# Altium PCB 数控电源.PcbDoc (part 4 of 4)
Units mm, origin at the board's own origin, x right, y up, seen from the top; angles counter-clockwise.
Board outline 99.32 x 99.37 mm, 4 copper layers (Top Layer 1, GND, POWER, Bottom Layer), stack 0.603 mm thick; 325 components, 180 nets, 929 pads, 616 vias.
Unrouted connection lines stored in the file: 13.
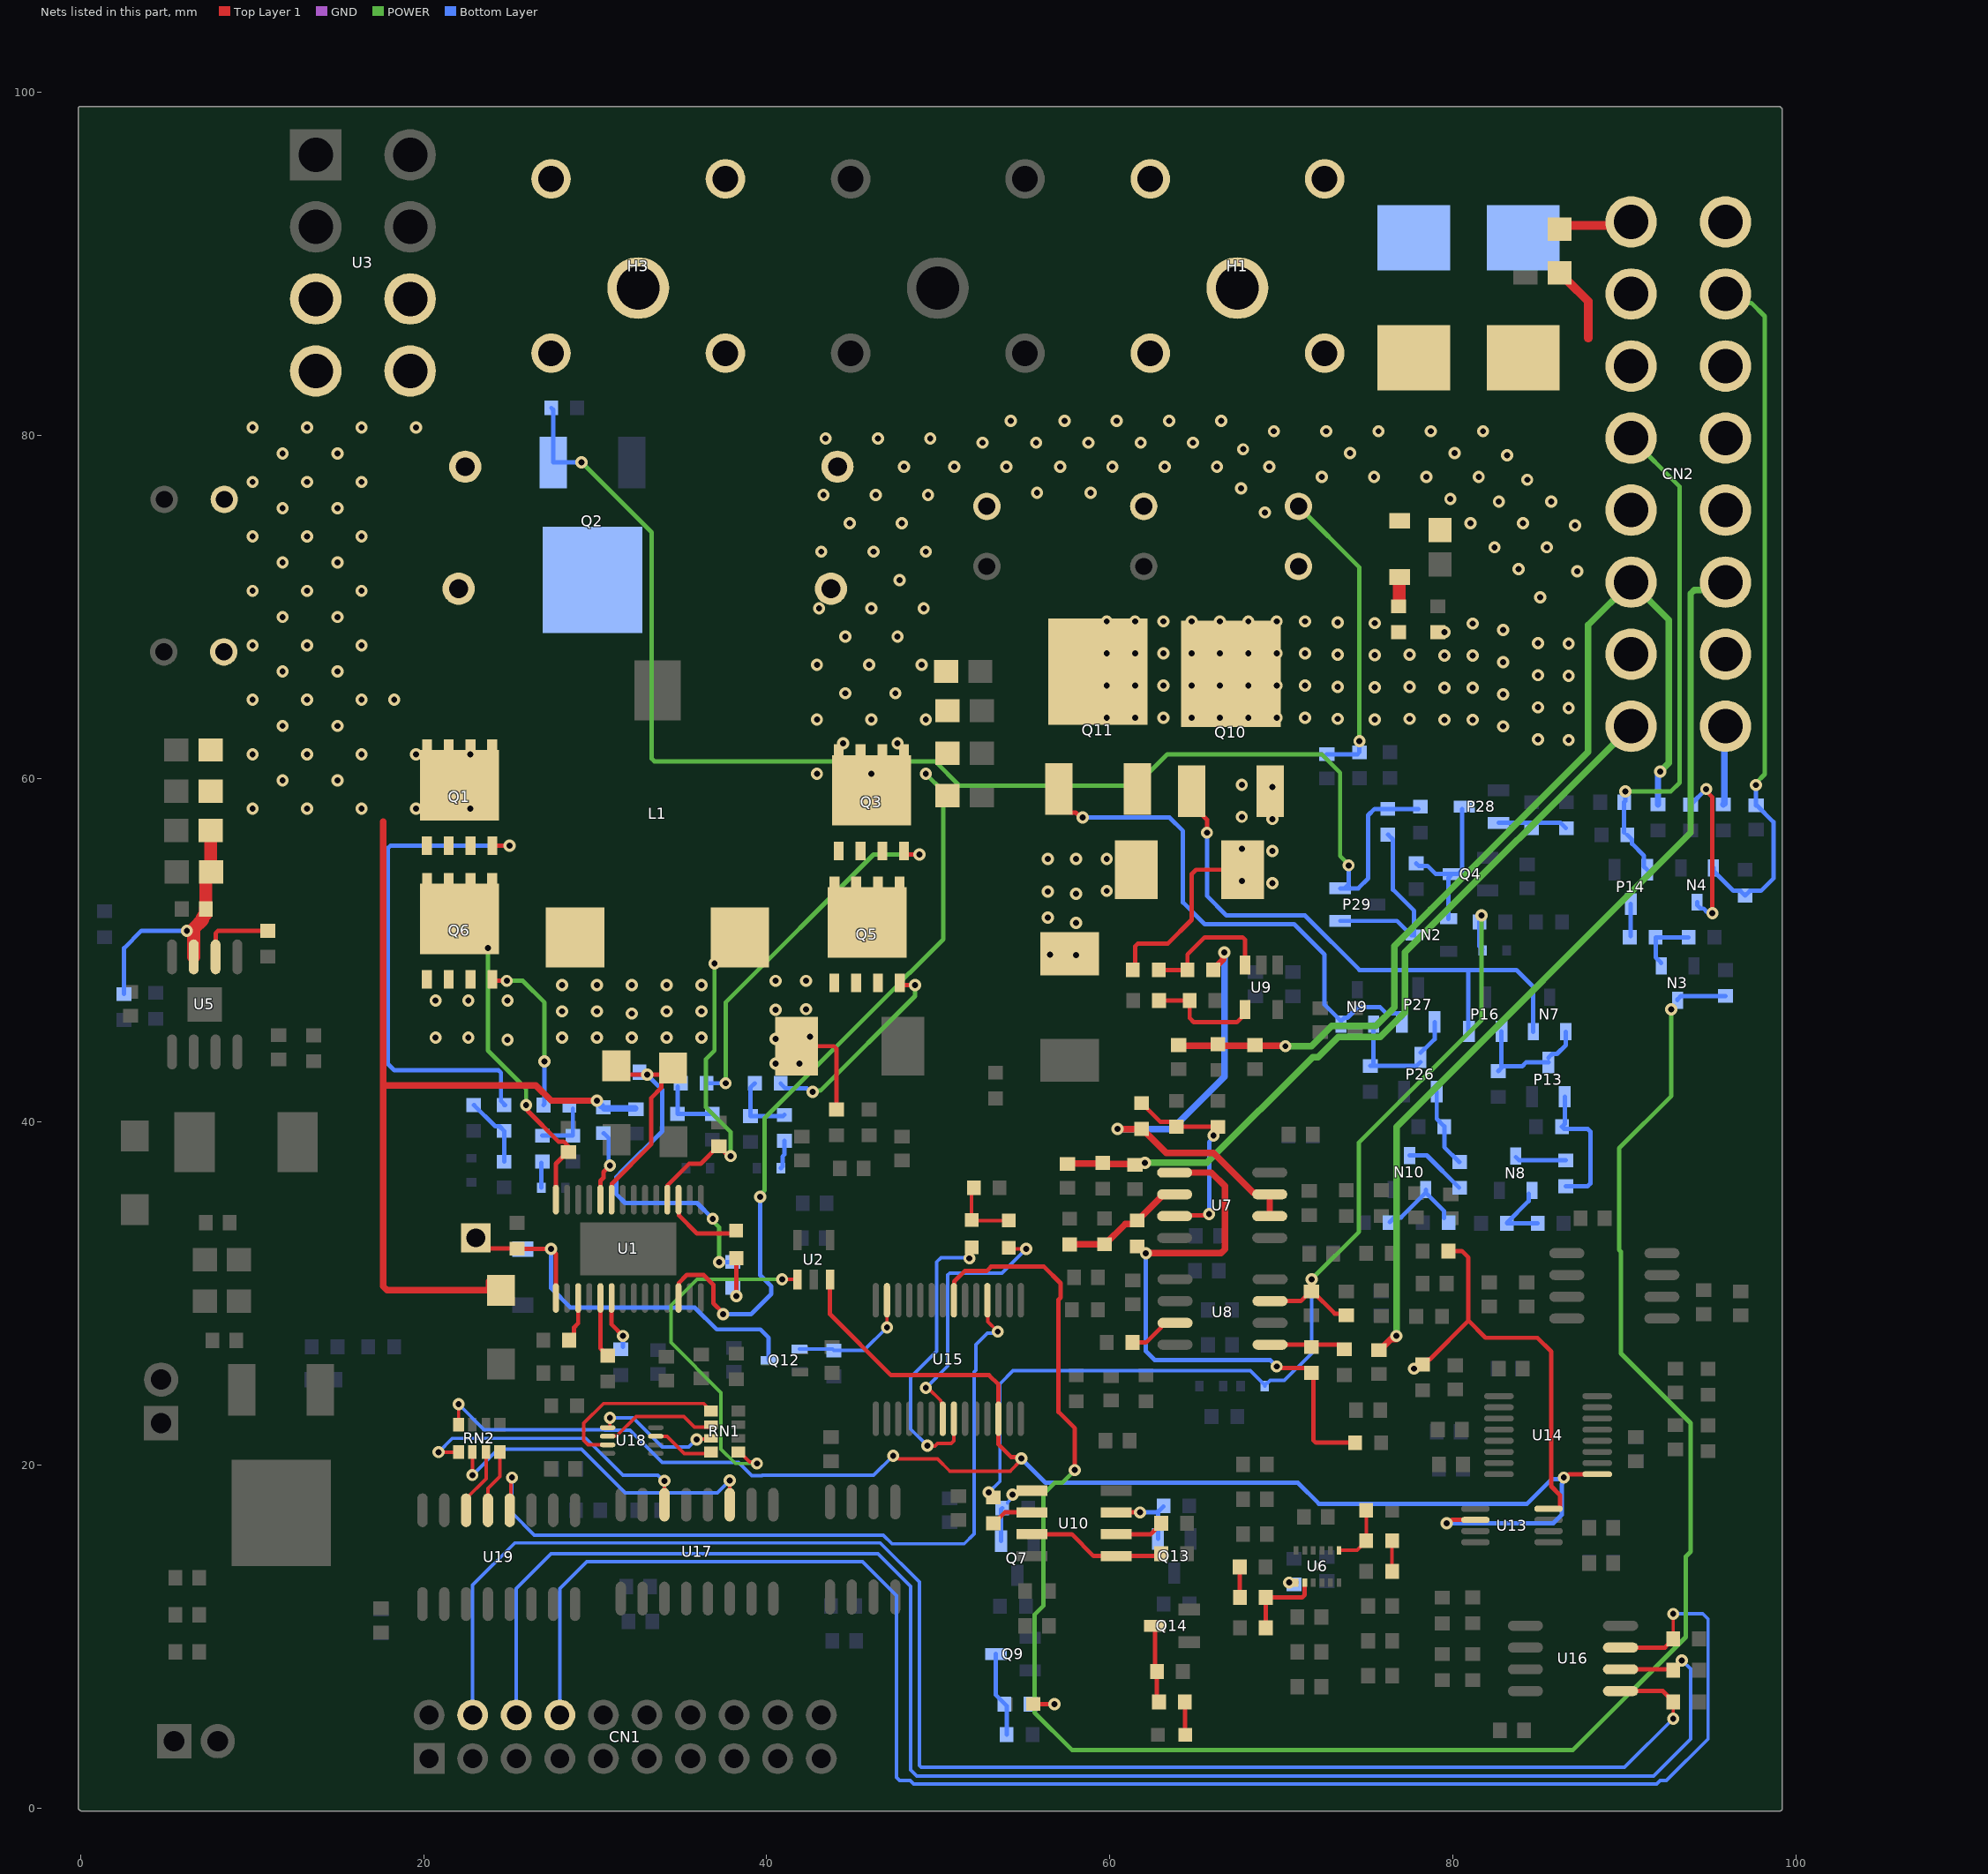
[diagram p5: the nets of this part, all layers, seen from the top]

## Via types
v1: diameter 0.711, hole 0.356, Top Layer 1 to Bottom Layer, 600 vias
v2: diameter 0.5, hole 0.3, Top Layer 1 to Bottom Layer, 12 vias
v3: diameter 0.61, hole 0.305, Top Layer 1 to Bottom Layer, 4 vias

## Nets (pads, with @x,y where several pads share a name; then routed paths per layer and width w, separated by ;. In a path a pad name is that pad's centre, name@x,y a point inside that pad or via, vN(x,y) a via of type N, cw(c..) or ccw(c..) an arc to the next point about the centre after c; other vN are vias at no path point) (continued)
NetD8_1: D8.1 R24.2 | length 1.7
  Bottom Layer w0.254: D8.1@40.826,37.296 40.923,37.392 40.923,37.976 41.026,38.08 R24.2@41.026,38.891
NetD9_1: D9.1 R22.2 | length 1.5
  Bottom Layer w0.254: D9.1@26.859,36.151 R22.2@26.859,37.618
NetD10_1: D10.1 R96.1 | length 2.6
  Top Layer 1 w0.254: D10.1@55.537,6.055 55.541,6.052 v1(56.77,6.052)
  Bottom Layer w0.254: R96.1@55.364,6.052 v1(56.77,6.052)
NetD12_1: D12.1 R57.1 | length 1.9
  Top Layer 1 w0.254: D12.1@64.372,4.291 R57.1@64.372,6.179
NetD14_1: D14.1 U1.17 | length 4.8
  Top Layer 1 w0.254: U1.17@34.86,35.462 34.86,35.176 34.819,35.135 34.877,35.077 34.877,34.549 35.942,33.484 38.06,33.484 D14.1@38.224,33.649
NetD14_2: D14.2 R8.1 | length 2.2
  Top Layer 1 w0.254: v1(38.231,29.837) D14.2@38.231,32.05
NetD15_1: D15.1 D16.1 R34.1 | length 4.1
  Top Layer 1 w0.203: R34.1@52.071,36.151 51.94,36.021 D16.1@51.94,34.284 51.978,34.246 D15.1@54.103,34.246
NetF1_2: F1.2 H1.1 H1.2 H1.3 H1.4 H1.5
NetF2_2: F2.2 H3.1 H3.2 H3.3 H3.4 H3.5
NetN2_1: N2.1 P28.3 Q4.3 R85.2 | length 9.3
  Bottom Layer w0.254: R85.2@77.852,55.065 77.999,54.918 78.516,54.918 78.995,54.439 Q4.3@79.962,54.439 ; N2.1@79.739,51.833 79.739,54.216 Q4.3@79.962,54.439 ; P28.3@80.525,58.239 80.525,54.662 80.302,54.439 Q4.3@80.027,54.439 Q4.3@79.962,54.439
NetN2_3: N2.3 P29.1 R11.1 | length 11.2
  Bottom Layer w0.254: P29.1@73.423,51.711 76.737,51.711 77.565,50.883 N2.3@77.74,50.883 77.74,52.296 76.506,53.531 76.506,56.457 76.23,56.734 R11.1@76.201,56.734
NetN3_1: N3.1 R99.1 R101.2 | length 3.6
  Bottom Layer w0.254: N3.1@92.142,49.263 91.813,49.591 R99.1@91.813,50.756 R101.2@93.735,50.756
NetN4_3: N4.3 R97.2 | length 9.8
  Top Layer 1 w0.254: v1(94.765,59.397) 94.765,59.273 95.124,58.914 v1(95.124,52.153)
  Bottom Layer w0.254: R97.2@93.854,58.486 v1(94.765,59.397) ; N4.3@94.235,52.803 94.235,52.628 94.433,52.43 94.608,52.43 94.798,52.241 v1@95.036,52.241
NetN7_1: N7.1 P13.3 P16.1 R95.1 | length 7.4
  Bottom Layer w0.254: R95.1@82.643,42.957 R95.1@82.831,43.145 ; P16.1@82.831,45.268 R95.1@82.831,43.145 ; P13.3@85.564,43.458 84.257,43.458 84.032,43.233 82.919,43.233 R95.1@82.831,43.145 ; P13.3@85.564,43.733 85.787,43.956 86.062,43.956 86.58,44.474 N7.1@86.58,45.252
NetN7_2: N7.2 P16.2 Q10.1 | length 33.9
  Top Layer 1 w0.254: Q10.1@64.766,59.27 65.439,58.597 65.439,57.835 65.66,57.614 v1(65.66,56.852)
  Bottom Layer w0.254: v1(65.66,56.852) 65.66,53.169 66.803,52.026 71.375,52.026 74.55,48.851 80.9,48.851 ; P16.2@80.931,45.268 80.9,45.299 80.9,48.851 ; N7.2@84.68,45.252 84.68,47.865 83.694,48.851 80.9,48.851
NetN8_1: N8.1 R74.2 R104.1 | length 4
  Bottom Layer w0.254: N8.1@84.411,35.8 84.411,35.373 83.142,34.105 R104.1@83.142,34.076 R74.2@84.938,34.076
NetN8_3: N8.3 R92.2 | length 3
  Bottom Layer w0.254: N8.3@83.659,37.948 83.857,37.75 R92.2@86.58,37.75
NetN9_1: N9.1 P26.3 P27.1 R122.1 | length 7.4
  Bottom Layer w0.254: R122.1@75.185,43.254 77.88,43.254 P26.3@78.106,43.48 ; R122.1@75.373,43.442 N9.1@75.373,45.694 ; P26.3@78.106,44.03 78.329,44.253 78.369,44.253 78.929,44.813 P27.1@78.929,45.819
NetN9_2: N9.2 P27.2 Q11.1 | length 30.8
  Top Layer 1 w0.254: Q11.1@57.019,59.397 57.019,58.697 57.692,58.024 58.014,58.024 v1@58.297,57.741
  Bottom Layer w0.254: v1(58.421,57.741) 63.479,57.741 64.263,56.957 64.263,52.788 65.533,51.518 70.74,51.518 72.518,49.74 72.518,46.824 N9.2@73.473,45.869 ; N9.2@73.473,45.694 N9.2@73.473,45.869 ; P27.2@77.029,46.094 76.806,46.317 76.114,46.317 75.739,46.692 74.471,46.692 73.846,46.067 73.671,46.067 N9.2@73.473,45.869
NetN10_1: N10.1 R89.2 R123.1 | length 4.9
  Bottom Layer w0.254: R123.1@76.319,34.148 76.595,34.424 76.978,34.424 N10.1@78.421,35.867 ; N10.1@78.421,36.042 N10.1@78.421,35.867 ; R89.2@79.472,34.395 79.472,34.815 N10.1@78.421,35.867
NetN10_3: N10.3 R111.2 | length 3.7
  Bottom Layer w0.254: N10.3@77.471,38.041 78.473,38.041 R111.2@80.363,36.151
NetP13_1: P13.1 R82.2 R92.1 | length 8.1
  Bottom Layer w0.254: P13.1@86.514,41.458 86.514,39.869 R82.2@86.352,39.707 86.479,39.58 87.863,39.58 88.012,39.431 88.012,36.405 87.85,36.243 R92.1@86.58,36.243
NetP14_3: P14.3 R99.2 | length 1.9
  Bottom Layer w0.254: R99.2@90.364,50.813 P14.3@90.364,52.693
NetP26_1: P26.1 R109.2 R111.1 | length 4.6
  Bottom Layer w0.254: P26.1@79.056,41.755 79.056,40.174 R109.2@79.494,39.736 ; R109.2@79.494,39.707 79.494,38.527 80.363,37.658 R111.1@80.392,37.658
NetP28_2: P28.2 R13.1 R33.2 | length 4.1
  Bottom Layer w0.254: P28.2@82.662,57.426 86.275,57.426 R13.1@86.586,57.115
NetP29_2: P29.2 Q2.1 R10.1 R11.2 R75.2 | length 81.8
  POWER w0.254: v1(29.211,78.442) 33.3,74.353 33.3,61.166 33.449,61.018 49.81,61.018 51.237,59.591 61.522,59.591 63.356,61.424 72.35,61.424 73.423,60.352 73.423,55.497 73.915,55.005 v1(73.915,54.947)
  Bottom Layer w0.254: R75.2@27.441,81.617 27.555,81.504 Q2.1@27.555,78.437 27.56,78.442 v1(29.211,78.442) ; v1(73.915,54.947) 73.915,53.834 73.692,53.611 P29.2@73.423,53.611 74.484,53.611 75.058,54.185 75.058,57.868 75.43,58.24 R11.2@76.201,58.24 R10.1@77.979,58.24
NetQ1_4: Q1.4 R16.1 | length 29.6
  Top Layer 1 w0.254: Q1.4@24.004,56.09 v1(25.02,56.09)
  Bottom Layer w0.254: R16.1@24.695,40.97 24.759,40.97 24.512,41.217 24.512,42.86 24.363,43.009 18.289,43.009 17.908,43.39 17.908,55.941 18.057,56.09 v1(25.02,56.09)
NetQ2_2: Q2.2 U12.1 U21.1
NetQ3_4: Q3.4 R17.2 | length 21.7
  Top Layer 1 w0.254: Q3.4@48.007,55.795 48.007,55.745 48.169,55.582 v1(48.896,55.582)
  POWER w0.254: v1(37.602,42.249) 37.602,46.956 46.23,55.583 v1(48.896,55.582) v1(48.896,55.582)
  Bottom Layer w0.254: R17.2@36.497,42.249 v1(37.602,42.249)
NetQ5_1: Q5.1 Q5.2 Q5.3 Q6.1 Q6.2 Q6.3 R28.1 R29.2 | length 5.9
  Top Layer 1 w0.254: R29.2@41.73,44.406 43.921,44.406 44.07,44.257 R28.1@44.07,40.714
  other v1: 40.514,43.39 41.911,43.39 24.893,44.787 40.514,44.829 20.702,44.914 22.607,44.914 28.068,44.914 30.1,44.914 32.132,44.914 34.164,44.914 36.196,44.914 42.52,44.951 32.132,46.311 28.068,46.438 30.1,46.438 34.164,46.438 36.196,46.438 40.514,46.523 42.292,46.565 20.702,47.073 22.607,47.073 24.893,47.073 28.068,47.962 30.1,47.962 32.132,47.962 34.164,47.962 36.196,47.962 40.514,48.216 42.292,48.216
NetQ5_4: Q5.4 R23.2 | length 11.9
  Top Layer 1 w0.254: Q5.4@47.753,48.089 47.88,47.962 v1(48.642,47.962)
  POWER w0.254: v1(42.673,41.739) 42.749,41.815 43.13,41.815 48.642,47.327 v1(48.642,47.962)
  Bottom Layer w0.254: R23.2@40.815,42.249 40.815,42.22 41.091,41.944 42.345,41.944 42.549,41.739 v1(42.673,41.739)
NetQ6_4: Q6.4 R9.1 | length 9.7
  Top Layer 1 w0.254: Q6.4@24.004,48.302 24.09,48.216 v1(24.849,48.216)
  GND w0.254: v1@24.761,48.127 v1(24.849,48.216)
  POWER w0.254: v1(24.849,48.216) 25.782,48.216 27.052,46.946 v1(27.052,43.517)
  Bottom Layer w0.254: R9.1@26.989,40.979 27.052,41.041 v1(27.052,43.517)
NetQ7_1: Q7.1 R121.1 U10.1 | length 2.6
  Bottom Layer w0.203: R121.1@54.032,17.784 54.032,17.812 54.235,18.016 54.235,18.164 v1(54.333,18.261)
  Bottom Layer w0.254: Q7.1@53.661,15.561 53.661,17.412 R121.1@53.73,17.482
NetQ9_3: Q9.3 R14.1 R96.2 | length 5
  Bottom Layer w0.254: Q9.3@53.357,8.973 53.357,6.581 53.984,5.954 R14.1@53.984,4.274
NetQ10_3: Q10.3 R77.2 R79.2 | length 11.1
  Top Layer 1 w0.254: R77.2@61.342,48.851 61.469,48.978 61.469,50.226 61.618,50.375 63.374,50.375 64.771,51.772 64.771,54.439 65.025,54.693 R79.2@67.745,54.693
  other v1: 69.47,53.908 67.692,54.035 69.47,55.778 67.692,55.905 69.47,57.649 67.692,57.776 69.47,59.519 67.692,59.646
NetQ11_3: Q11.3 R79.1 R84.2
  other v1: 58.04,49.717 56.516,49.74 58.04,51.587 56.389,51.899 58.04,53.296 56.389,53.423 59.818,53.458 56.389,55.328 58.04,55.328 59.818,55.328
NetQ13_1: Q13.1 R124.1 U10.7 | length 4.6
  Top Layer 1 w0.254: U10.7@60.364,17.228 v1(61.765,17.228)
  Bottom Layer w0.254: v1@61.853,17.141 v1(61.765,17.228) 62.747,17.228 62.823,17.304 62.852,17.304 R124.1@63.128,17.58 ; Q13.1@62.805,15.688 R124.1@62.805,17.257
NetQ14_3: Q14.3 R27.1 R57.2 | length 4.2
  Top Layer 1 w0.254: R27.1@62.628,8.077 Q14.3@62.628,10.624 ; R57.2@62.747,6.297 R27.1@62.747,7.957
NetR2_1: R2.1 U1.6 | length 3.1
  Top Layer 1 w0.254: U1.6@30.958,29.731 30.958,28.181 v1(31.624,27.515)
  Bottom Layer w0.254: R2.1@31.624,26.871 v1(31.624,27.515)
NetR3_1: R3.1 U1.5 | length 3.6
  Top Layer 1 w0.254: U1.5@30.308,29.731 30.308,26.79 30.43,26.668 30.43,26.64 30.706,26.363 R3.1@30.735,26.363
NetR5_2: R5.2 U1.3 | length 2.7
  Top Layer 1 w0.254: R5.2@28.487,27.263 28.764,27.539 28.764,28.004 29.01,28.25 U1.3@29.01,29.731
NetR6_1: R6.1 U1.24 | length 4.3
  Top Layer 1 w0.254: U1.24@30.308,35.462 30.308,36.559 30.483,36.734 30.483,37.067 v1(30.862,37.445)
  Bottom Layer w0.254: R6.1@30.481,39.335 30.51,39.335 30.786,39.058 30.786,37.521 v1(30.862,37.445)
NetR9_2: R9.2 R22.1 R25.1 | length 3.4
  Bottom Layer w0.254: R22.1@26.925,39.19 R25.1@28.703,39.19 R9.2@28.703,40.772
NetR15_1: R15.1 R16.2 R20.1 | length 4.2
  Bottom Layer w0.254: R15.1@22.917,40.97 22.945,40.97 24.176,39.739 24.418,39.739 R16.2@24.695,39.463 R20.1@24.695,37.677
NetR17_1: R17.1 R18.1 R21.1 | length 3.6
  Bottom Layer w0.254: R17.1@34.799,42.057 R21.1@34.799,40.46 R18.1@36.831,40.46
NetR23_1: R23.1 R24.1 R26.1 | length 4
  Bottom Layer w0.254: R23.1@39.308,42.249 39.046,41.986 R26.1@39.046,40.335 40.964,40.335 R24.1@41.026,40.398
NetR38_2: R38.2 ZD3.2 | length 1.7
  Top Layer 1 w0.762: R38.2@76.836,70.051 76.843,70.051 76.865,70.074 76.865,71.731 ZD3.2@76.895,71.761
NetR42_2: R42.2 U5.6 | length 4.5
  Top Layer 1 w0.254: U5.6@7.875,49.613 7.875,50.988 8.024,51.137 10.914,51.137 R42.2@10.923,51.128
NetR49_1: R49.1 R50.2 | length 1.8
  Top Layer 1 w0.254: R49.1@67.573,14.053 67.582,14.044 R50.2@67.582,12.275
NetR50_1: R50.1 R115.2 U6.2 | length 4.8
  Top Layer 1 w0.254: R115.2@69.089,10.497 R50.1@69.089,12.275 71.211,12.275 71.36,12.424 U6.2@71.36,13.139
NetR51_1: R51.1 U6.1 | length 0.4
  Top Layer 1 w0.254: v1(70.46,13.139) U6.1@70.859,13.139
NetR58_1: R58.1 R59.2 R62.1 U7.3 | length 12.4
  Top Layer 1 w0.254: R59.2@61.85,41.095 61.879,41.095 62.155,40.819 62.155,40.79 62.953,39.992 63.606,39.992 R58.1@63.882,39.716 63.89,39.707 R62.1@66.266,39.707 ; U7.3@63.776,34.5 63.83,34.554 65.787,34.554 v1(65.787,34.627) ; v1(66.041,39.199) 66.041,39.482 R62.1@66.266,39.707 ; R62.1@66.295,39.707 R62.1@66.266,39.707
  Bottom Layer w0.254: v1(65.787,34.627) 65.787,38.821 66.041,39.075 v1(66.041,39.199)
NetR59_1: R59.1 R76.1 U7.6 U7.7 | length 27.7
  Top Layer 1 w0.381: v1(60.453,39.58) 61.841,39.58 R59.1@61.85,39.589 61.879,39.589 63.284,38.183 66.041,38.183 68.35,35.874 68.433,35.874 68.537,35.77 U7.7@69.321,35.77 U7.6@69.321,34.5 ; R76.1@66.032,48.851 66.032,48.88 66.613,49.46 66.613,49.804 v1(66.676,49.867)
  Bottom Layer w0.381: v1(60.453,39.58) 63.628,39.58 66.676,42.628 v1(66.676,49.867)
NetR67_1: R67.1 R68.1 U8.5 | length 4.4
  Top Layer 1 w0.254: U8.5@69.343,27.007 73.398,27.007 R68.1@73.661,26.744
NetR70_1: R70.1 R71.2 R72.1 U7.2 | length 7.4
  Top Layer 1 w0.381: R72.1@57.659,32.849 57.663,32.853 59.686,32.853 R70.1@59.691,32.858 59.72,32.858 60.895,34.033 61.383,34.033 R71.2@61.596,34.246 61.625,34.246 63.008,35.63 63.008,35.674 63.104,35.77 U7.2@63.776,35.77
NetR76_2: R76.2 R77.1 U9.3 | length 7.9
  Top Layer 1 w0.254: R77.1@62.848,48.851 R76.2@64.525,48.851 64.525,49.749 65.533,50.756 67.736,50.756 67.885,50.607 U9.3@67.885,49.135
NetR80_1: R80.1 U8.3 | length 3
  Top Layer 1 w0.254: R80.1@61.324,27.134 62.109,27.134 63.006,28.031 63.006,28.123 63.16,28.277 U8.3@63.798,28.277
NetR86_1: R86.1 R87.1 U9.4 | length 6.6
  Top Layer 1 w0.254: R87.1@62.866,47.073 R86.1@64.652,47.073 64.652,46.048 64.898,45.803 67.403,45.803 67.885,46.285 U9.4@67.885,46.535
NetR88_2: R88.2 U10.2 | length 2.5
  Top Layer 1 w0.254: R88.2@53.214,16.593 53.243,16.593 53.878,17.228 U10.2@55.462,17.228
NetR102_2: R102.2 U10.3 U10.5 | length 7.9
  Top Layer 1 w0.254: U10.3@55.462,15.958 57.786,15.958 59.056,14.688 U10.5@60.364,14.688 R102.2@62.866,14.688
NetR110_2: R110.2 U10.6 | length 2.9
  Top Layer 1 w0.254: U10.6@60.364,15.958 62.387,15.958 R110.2@62.993,16.564
NetR116_1: R116.1 R117.2 U6.7 | length 3.6
  Top Layer 1 w0.203: U6.7@73.359,15.018 74.416,15.018 74.946,15.548 R117.2@74.946,15.577 R116.1@74.946,17.355
NetR117_1: R117.1 R118.2 | length 1.8
  Top Layer 1 w0.203: R118.2@76.452,13.799 R117.1@76.452,15.577
NetRN1_1: RN1.1 U18.7 | length 10.6
  Top Layer 1 w0.203: U18.7@30.727,21.17 29.587,21.17 29.338,21.419 29.338,22.435 30.481,23.578 36.323,23.578 36.456,23.445 36.456,23.37 36.68,23.146 RN1.1@36.755,23.146
NetRN1_2: RN1.2 U18.6 | length 6.8
  Top Layer 1 w0.203: U18.6@30.727,21.671 30.732,21.676 31.245,21.676 32.385,22.816 35.18,22.816 35.797,22.199 36.607,22.199 RN1.2@36.755,22.346
NetRN1_3: RN1.3 U18.5 | length 7.5
  Top Layer 1 w0.203: U18.5@30.727,22.171 30.827,22.171 30.862,22.206 v1(30.862,22.74) ; v1(35.909,21.488) 35.939,21.517 36.725,21.517 RN1.3@36.755,21.546
  Bottom Layer w0.203: v1(30.862,22.74) 32.208,22.74 33.91,21.038 35.46,21.038 v1(35.909,21.488)
NetRN1_4: RN1.4 U18.3 | length 3.7
  Top Layer 1 w0.203: U18.3@33.539,21.665 34.198,21.665 35.206,20.657 36.666,20.657 RN1.4@36.755,20.746
NetRN2_1: RN2.1 U17.14 | length 17.1
  Top Layer 1 w0.203: v1(20.867,20.746) RN2.1@22.043,20.746 ; U17.14@34.037,17.678 v1(34.037,19.074)
  Bottom Layer w0.203: v1(20.867,20.746) 21.667,21.546 29.465,21.546 31.624,19.387 33.664,19.387 33.976,19.074 v1(34.037,19.074)
NetRN2_2: RN2.2 U17.11 | length 19.7
  Top Layer 1 w0.203: v1(22.843,19.409) RN2.2@22.843,20.746 ; U17.11@37.847,17.678 v1(37.847,19.097)
  Bottom Layer w0.203: v1(22.843,19.409) 24.345,20.911 29.211,20.911 31.751,18.371 33.734,18.371 33.742,18.363 34.331,18.363 34.339,18.371 37.121,18.371 v1(37.847,19.097)
NetRN2_3: RN2.3 U19.14 | length 3.9
  Top Layer 1 w0.203: U19.14@22.48,17.355 22.48,18.04 23.643,19.203 RN2.3@23.643,20.746
NetRN2_4: RN2.4 U19.13 | length 3.7
  Top Layer 1 w0.203: U19.13@23.75,17.355 23.75,18.625 24.443,19.319 RN2.4@24.443,20.746
OE_GREEN: D15.2 U15.7 | length 15.5
  Top Layer 1 w0.203: v1(49.277,24.492) 49.394,24.492 50.149,23.737 50.149,23.671 50.262,23.558 U15.7@50.262,22.689 ; D15.2@54.23,32.527 54.298,32.595 v1(55.119,32.595)
  Bottom Layer w0.203: v1(49.277,24.492) 50.547,25.762 50.547,31.069 50.666,31.188 53.711,31.188 v1(55.119,32.595)
OE_RED: D16.2 U15.8 | length 17.3
  Top Layer 1 w0.203: v1(49.358,21.114) 49.384,21.088 49.812,21.088 49.965,21.241 50.75,21.241 50.913,21.404 U15.8@50.913,22.689 ; v1(51.817,32.036) D16.2@51.817,32.554
  Bottom Layer w0.203: v1(49.358,21.114) 48.388,22.084 48.388,25.102 49.912,26.626 49.912,31.833 50.166,32.087 51.766,32.087 v1(51.817,32.036)
OUTC+: C76.2 C86.2 CN2.3 CN2.4 CN2.11 CN2.12 F1.1 P14.2 R90.2 | length 34.1
  Top Layer 1 w0.508: C76.2@86.218,89.491 86.248,89.491 86.669,89.07 86.669,89.04 87.885,87.824 87.885,85.681
  POWER w0.254: v1(90.044,59.265) 92.711,59.265 93.219,59.773 93.219,77.024 CN2.12@90.386,79.857
  Bottom Layer w0.254: R90.2@89.982,56.877 C86.2@89.982,58.63 90.044,58.692 v1(90.044,59.265) ; R90.2@90.162,56.725 90.438,56.449 90.438,56.203 91.128,55.513 91.128,54.878 P14.2@91.314,54.693
OUTC-: C83.1 C88.1 CN2.1 CN2.2 CN2.9 CN2.10 F2.1 N4.2 R103.2 | length 44.9
  Top Layer 1 w0.508: C83.1@86.218,92.031 86.431,92.244 CN2.9@90.173,92.244
  POWER w0.254: CN2.2@95.886,88.257 96.411,87.732 97.391,87.732 98.172,86.951 98.172,60.263 97.664,59.755 v1(97.664,59.631)
  Bottom Layer w0.254: N4.2@95.185,54.802 95.185,54.627 96.349,53.463 96.753,53.463 R103.2@97.029,53.186 97.305,53.463 97.957,53.463 98.68,54.185 98.68,57.475 C88.1@97.714,58.441 ; C88.1@97.664,58.441 v1(97.664,59.631)
RESET/: U15.18 U19.12 | length 46.7
  Top Layer 1 w0.203: U19.12@25.02,17.355 25.087,17.422 25.087,19.193 v1(25.154,19.26) ; U15.18@52.863,29.598 52.894,29.567 52.894,28.343 v1(53.468,27.769)
  Bottom Layer w0.203: v1(25.154,19.26) 25.154,17.213 26.46,15.907 46.799,15.907 47.307,15.399 51.512,15.399 52.096,15.983 52.096,25.407 52.198,25.509 52.198,27.007 52.863,27.672 53.371,27.672 v1(53.468,27.769)
SCLK: RN2.8 U2.3 U13.6 U14.1 U15.12 | length 101.9
  Top Layer 1 w0.203: RN2.8@22.043,22.346 v1(22.043,23.541) ; v1(47.372,20.53) 47.509,20.53 47.687,20.352 49.952,20.352 50.664,19.641 54.189,19.641 54.797,20.248 v1@54.964,20.248
  Top Layer 1 w0.254: U2.3@43.684,30.796 43.684,28.79 47.245,25.229 52.96,25.229 53.511,24.678 U15.12@53.511,22.689 53.511,21.187 54.241,20.458 54.754,20.458 v1(54.842,20.37) ; v1@54.842,20.271 v1@54.987,20.271 ; v1(79.63,16.593) 79.753,16.593 79.952,16.791 U13.6@81.309,16.791 ; v1(86.462,19.26) 86.586,19.26 86.782,19.456 U14.1@88.411,19.456
  Bottom Layer w0.203: v1(22.043,23.541) 23.53,22.054 30.542,22.054 30.567,22.029 32.03,22.029 33.91,20.149 38.355,20.149 38.718,19.786 39.135,19.369 39.724,19.369 39.742,19.387 46.229,19.387 v1(47.372,20.53)
  Bottom Layer w0.254: v1(54.842,20.37) 56.252,18.96 70.957,18.96 72.18,17.736 84.322,17.736 85.758,19.173 86.321,19.173 v1@86.348,19.146 ; v1(79.63,16.593) 85.853,16.593 86.348,17.088 86.348,18.883 86.375,18.91 86.375,19.119 v1@86.348,19.146 ; v1(86.462,19.26) v1@86.348,19.146
SENSE+: C11.2 C13.2 C15.1 C16.2 C19.1 C25.2 C34.2 C64.2 C74.1 C77.1 C79.1 C136.1 CN2.5 CN2.6 CN2.13 CN2.14 Q3.5 Q3.6 Q3.7 Q3.8 Q3.9 R12.2 R61.2 R94.1 U1.12 U12.2 U21.2 ZD3.1 | length 173.9
  Top Layer 1 w0.254: U1.12@34.86,29.731 34.877,29.749 34.877,30.606 35.342,31.071 36.323,31.071 36.884,30.51 36.884,29.424 37.466,28.842 v1(37.466,28.785)
  Top Layer 1 w0.381: C74.1@64.009,44.471 64.041,44.439 70.199,44.439 v1(70.232,44.406) ; C79.1@75.693,26.691 75.743,26.691 76.377,27.325 76.709,27.325 v1(76.709,27.515)
  POWER w0.254: v1(39.622,35.62) 39.622,35.743 39.879,36 39.879,40.215 47.905,48.241 47.905,48.267 48.337,48.699 48.362,48.699 50.293,50.629 50.293,59.265 v1(49.277,60.281) ; C136.1@70.994,75.874 74.55,72.318 v1(74.55,62.186)
  POWER w0.381: v1(70.232,44.406) 71.756,44.406 72.937,45.587 75.504,45.587 76.576,46.659 76.576,50.254 78.691,52.369 87.885,61.563 87.885,68.956 CN2.14@90.386,71.457 92.584,69.259 92.584,62.505 92.581,62.502 92.581,60.913 v1(92.076,60.408) ; v1(76.709,27.515) 76.709,39.71 93.854,56.855 93.854,70.782 94.077,71.005 95.434,71.005 CN2.6@95.886,71.457
  Bottom Layer w0.254: v1(37.466,28.785) 39.084,28.785 40.26,29.961 40.26,30.41 39.625,31.045 39.625,35.617 v1(39.622,35.62) ; C25.2@72.645,61.427 R12.2@74.443,61.427 ; R12.2@74.55,61.534 v1(74.55,62.186)
  Bottom Layer w0.381: R94.1@91.949,58.494 91.949,60.192 92.076,60.319 v1(92.076,60.408)
  other v1: 42.927,60.281 46.102,60.281 44.451,62.059 47.626,62.059 42.927,63.456 46.102,63.456 49.277,63.456 44.578,64.98 47.499,64.98 42.927,66.631 45.975,66.631 49.023,66.631 44.578,68.282 47.626,68.282 43.054,69.933 46.102,69.933 49.15,69.933 85.091,70.568 47.753,71.584 87.25,72.092 83.821,72.219 43.181,73.235 46.229,73.235 49.277,73.235 82.424,73.489 85.472,73.489 87.123,74.759 44.832,74.886 47.88,74.886 81.027,74.886 84.075,74.886 69.039,75.521 82.678,76.156 85.726,76.156 79.849,76.317 43.308,76.537 46.356,76.537 49.404,76.537 55.754,76.664 58.879,76.664 67.642,76.918 84.329,77.426 72.356,77.587 75.404,77.587 78.452,77.587 81.5,77.587 48.007,78.188 50.928,78.188 53.976,78.188 57.101,78.188 60.149,78.188 63.197,78.188 66.245,78.188 69.293,78.188 83.151,78.857 74.007,78.984 80.103,78.984 67.769,79.204 52.579,79.585 55.704,79.585 58.752,79.585 61.8,79.585 64.848,79.585 43.435,79.839 46.483,79.839 49.531,79.839 69.562,80.254 72.61,80.254 75.658,80.254 78.706,80.254 81.754,80.254 54.23,80.855 57.355,80.855 60.403,80.855 63.451,80.855 66.499,80.855
SENSE-: C78.1 C80.1 C136.2 CN2.7 CN2.8 CN2.15 CN2.16 Q10.2 Q11.2 R35.1 R38.1 R69.2 R100.1 | length 50.2
  Top Layer 1 w0.381: C80.1@57.532,37.612 57.567,37.577 59.55,37.577 59.585,37.612 59.653,37.544 61.411,37.544 C78.1@61.469,37.486 ; C78.1@61.343,37.612 v1(62.041,37.612)
  POWER w0.381: v1(62.041,37.612) 65.66,37.612 71.819,43.771 72.137,43.771 73.318,44.952 75.768,44.952 77.211,46.396 77.211,49.882 CN2.16@90.386,63.057
  Bottom Layer w0.381: R100.1@95.759,58.494 95.822,58.558 CN2.8@95.822,62.994
  other v1: 86.742,62.255 84.964,62.29 82.932,63.052 79.503,63.433 81.154,63.433 75.439,63.456 73.28,63.491 77.471,63.491 59.818,63.56 61.469,63.56 63.12,63.56 64.771,63.56 66.422,63.56 68.073,63.56 69.724,63.56 71.375,63.56 86.742,64.126 84.964,64.16 82.932,64.922 79.503,65.303 81.154,65.303 75.439,65.326 73.28,65.361 77.471,65.361 59.818,65.43 61.469,65.43 63.12,65.43 64.771,65.43 66.422,65.43 68.073,65.43 69.724,65.43 71.375,65.43 86.742,65.996 84.964,66.031 82.932,66.793 79.503,67.174 81.154,67.174 75.439,67.197 73.28,67.231 77.471,67.231 59.818,67.301 61.469,67.301 63.12,67.301 64.771,67.301 66.422,67.301 68.073,67.301 69.724,67.301 71.375,67.301 86.742,67.866 84.964,67.901 79.503,68.536 82.932,68.663 81.154,69.044 75.439,69.067 73.28,69.102 59.818,69.171 61.469,69.171 63.12,69.171 64.771,69.171 66.422,69.171 68.073,69.171 69.724,69.171 71.375,69.171
SENSE_ERR: N3.3 R98.1 U15.21 | length 119
  Top Layer 1 w0.254: U15.21@50.913,29.598 50.933,29.619 50.933,30.696 51.537,31.3 52.82,31.3 53.074,31.554 56.16,31.554 57.132,30.582 57.132,29.751 57.01,29.629 57.01,23.084 57.959,22.135 v1(57.959,19.696)
  POWER w0.254: v1(57.959,19.696) 57.217,18.954 56.79,18.954 56.135,18.299 56.135,11.795 55.605,11.265 55.605,5.566 57.786,3.385 86.996,3.385 93.574,9.964 93.574,14.663 93.854,14.942 93.854,22.435 89.79,26.499 89.79,32.43 89.688,32.532 89.688,38.462 92.728,41.502 v1(92.728,46.548)
  Bottom Layer w0.254: N3.3@93.092,47.088 93.092,47.138 93.29,47.336 R98.1@95.886,47.336
SW1: C1.2 L1.2 Q1.1 Q1.2 Q1.3 Q6.5 Q6.6 Q6.7 Q6.8 Q6.9 U1.28 | length 17.1
  Top Layer 1 w0.254: v1(25.976,40.977) 26.064,40.89 26.064,40.641 27.858,38.847 28.156,38.847 28.397,38.606 28.397,38.297 C1.2@28.449,38.245 ; U1.28@27.71,35.462 27.71,37.556 C1.2@28.399,38.245
  POWER w0.254: v1(23.75,50.121) 23.75,44.152 25.976,41.925 v1(25.976,40.977)
SW2: C6.1 L1.3 Q3.1 Q3.2 Q3.3 Q5.5 Q5.6 Q5.7 Q5.8 Q5.9 U1.18 | length 18
  Top Layer 1 w0.254: U1.18@34.209,35.462 34.226,35.479 34.226,36.304 35.469,37.547 36.148,37.547 C6.1@37.162,38.561 ; C6.1@37.212,38.561 37.889,37.883 v1(37.889,38.001)
  GND w0.254: v1(37.889,38.001) v1@37.973,37.918
  POWER w0.254: v1(36.958,49.232) 36.958,44.152 36.45,43.644 36.45,40.85 37.889,39.411 v1(37.889,38.001)
TEM_CS: RN1.5 U2.1 | length 21.4
  Top Layer 1 w0.203: RN1.5@38.355,20.746 38.43,20.746 38.998,20.178 39.332,20.178 v1(39.429,20.08) ; v1(40.895,30.817) U2.1@41.762,30.817
  POWER w0.203: v1(39.429,20.08) 38.169,20.08 37.339,20.911 37.339,24.213 34.418,27.134 34.418,29.293 35.942,30.817 v1(40.895,30.817)
TTM_E0: CN1.4 R112.1 U16.1 | length 95.7
  Top Layer 1 w0.203: v1(92.838,5.2) R112.1@92.838,6.179
  Top Layer 1 w0.254: U16.1@89.768,6.814 92.232,6.814 R112.1@92.838,6.208
  Bottom Layer w0.203: CN1.4@22.861,5.417 22.861,12.999 25.312,15.45 46.61,15.45 48.896,13.164 48.896,2.488 49.015,2.369 90.006,2.369 v1(92.838,5.2)
TTM_E1: CN1.6 R113.1 U16.2 | length 97.9
  Top Layer 1 w0.203: R113.1@92.838,8.033 93.397,8.592 93.359,8.592 v1(93.348,8.604)
  Top Layer 1 w0.254: U16.2@89.768,8.084 R113.1@92.786,8.084
  Bottom Layer w0.203: CN1.6@25.401,5.417 25.401,12.783 27.433,14.815 46.483,14.815 48.388,12.91 48.388,2.231 48.757,1.861 91.695,1.861 93.854,4.02 93.854,8.098 v1@93.404,8.547 ; v1(93.348,8.604) v1@93.461,8.604
TTM_E2: CN1.8 R114.1 U16.3 | length 101.5
  Top Layer 1 w0.203: R114.1@92.838,9.862 v1(92.838,11.313)
  Top Layer 1 w0.254: U16.3@89.768,9.354 92.359,9.354 R114.1@92.838,9.833
  Bottom Layer w0.203: CN1.8@27.941,5.417 27.941,12.783 29.516,14.358 45.594,14.358 47.575,12.377 47.575,1.785 47.753,1.607 48.365,1.607 48.568,1.404 91.884,1.404 92.087,1.607 92.446,1.607 94.87,4.031 94.87,11.005 94.561,11.313 v1(92.838,11.313)
U_MON: R67.2 R71.1 R106.2 U7.1 | length 34.4
  Top Layer 1 w0.254: v1(69.724,25.737) 69.847,25.737 69.944,25.641 71.48,25.641 R67.2@71.756,25.365 ; R67.2@71.861,25.26 71.861,21.441 72.01,21.292 R106.2@74.304,21.292
  Top Layer 1 w0.381: R71.1@61.596,32.739 61.625,32.739 R71.1@62.023,32.341 ; v1(62.104,32.341) 66.483,32.341 66.707,32.564 66.707,36.247 65.914,37.04 U7.1@63.776,37.04
  Bottom Layer w0.254: v1(62.104,32.341) 62.104,26.626 62.612,26.118 69.343,26.118 v1(69.724,25.737)
U_SERVO: C39.2 C56.2 D11.1 D18.2 R88.1 R91.1 U8.7 | length 64
  Top Layer 1 w0.254: v1(52.945,18.389) 52.945,18.368 R88.1@53.214,18.1 ; U8.7@69.343,29.547 71.133,29.547 C39.2@71.706,30.12 ; C39.2@71.756,30.12 v1(71.756,30.817) ; C39.2@71.806,30.12 73.106,28.82 73.688,28.82 C56.2@73.788,28.72
  POWER w0.254: v1(71.756,30.817) 74.526,33.587 74.526,38.794 81.662,45.93 v1(81.662,52.026) v1@81.535,52.153
  Bottom Layer w0.203: v1(52.945,18.389) 53.595,19.039 53.595,24.721 54.357,25.483 68.188,25.483 D11.1@69.028,24.644 ; D11.1@69.028,24.594 D11.1@69.028,24.644 ; v1(71.756,30.817) 71.756,26.499 70.178,24.922 69.355,24.922 69.201,24.767 69.151,24.767 D11.1@69.028,24.644
  Bottom Layer w0.254: R91.1@81.543,51.645 81.543,50.225 D18.2@81.725,50.044
U_SET_OUT: R81.2 R108.2 U13.4 | length 24.5
  Top Layer 1 w0.254: R108.2@78.089,25.683 78.538,26.132 78.627,26.132 80.9,28.404 ; R81.2@79.739,32.468 80.519,32.468 80.9,32.087 80.9,28.404 ; U13.4@85.571,17.441 86.183,17.441 86.234,17.492 86.234,18.244 85.726,18.752 85.726,26.604 84.92,27.41 81.894,27.41 80.9,28.404
  other v1: 77.725,25.61
UVLO: Q12.1 R47.2 U15.27 | length 7.2
  Top Layer 1 w0.203: v1(47.011,28.02) U15.27@47.011,29.598
  Bottom Layer w0.203: Q12.1@41.911,26.753 R47.2@43.828,26.753 ; R47.2@43.913,26.668 45.659,26.668 v1(47.011,28.02)
UVLO_EN: H4.1 Q12.3 R1.1 U1.1 ZD1.1 | length 26.7
  Top Layer 1 w0.254: H4.1@23.044,33.232 23.67,32.605 R1.1@25.457,32.605 25.467,32.595 v1(27.433,32.595) 27.71,32.318 U1.1@27.71,29.731
  Bottom Layer w0.254: ZD1.1@25.797,32.595 v1(27.433,32.595) 27.433,30.309 28.576,29.166 35.815,29.166 37.085,27.896 39.625,27.896 40.115,27.406 Q12.3@40.115,26.103
VCC: C5.2 D2.1 D3.1 R8.2 U1.23 | length 30.5
  Top Layer 1 w0.254: U1.23@30.958,35.462 30.975,35.479 30.975,36.392 33.275,38.691 33.275,41.395 33.854,41.974 33.854,42.445 D3.1@34.156,42.747 ; D2.1@31.235,43.255 31.235,43.144 31.631,42.747 v1(33.028,42.747) D3.1@34.156,42.747 ; D3.1@34.537,43.128 D3.1@34.156,42.747
  POWER w0.254: v1(36.855,34.349) 36.855,34.225 37.219,33.861 v1(37.219,31.826)
  Bottom Layer w0.254: v1(33.028,42.747) 33.91,41.866 33.91,39.453 31.598,37.142 31.598,37.14 31.243,36.785 31.243,35.77 31.751,35.262 35.942,35.262 v1(36.855,34.349) ; v1(37.219,31.826) R8.2@38.03,31.826
VIN: C4.2 C12.1 C14.1 C17.2 C18.2 C20.2 C61.2 C63.2 D1.1 Q1.5 Q1.6 Q1.7 Q1.8 Q1.9 R6.2 R32.1 U3.3 U3.4 U3.5 U3.6 U5.7 | length 64.5
  Top Layer 1 w0.381: 17.654,57.487 17.654,42.12 ; D1.1@24.504,30.174 24.331,30.001 24.331,30.18 23.821,30.69 23.821,30.182 17.877,30.182 17.654,30.405 17.654,42.12 ; v1(30.1,41.231) 27.433,41.231 26.544,42.12 17.654,42.12
  Top Layer 1 w0.762: U5.7@6.605,49.613 6.605,51.137 ; 6.605,51.264 7.113,51.772 7.113,51.904 7.286,52.077 C63.2@7.286,52.407 ; C63.2@7.305,52.407 7.305,54.272 7.599,54.566 C61.2@7.605,54.566 ; C61.2@7.589,54.566 C20.2@7.589,56.979
  POWER w0.254: v1@6.19,51.15 v1(6.202,51.137)
  Bottom Layer w0.254: R32.1@2.541,47.445 2.541,50.121 3.557,51.137 v1(6.202,51.137)
  Bottom Layer w0.381: v1(30.1,41.231) 30.1,41.194 30.38,40.914 R6.2@30.408,40.914 ; R6.2@30.538,40.784 C4.2@32.328,40.784
  other v1: 10.034,58.249 13.209,58.249 16.384,58.249 19.559,58.249 22.734,58.249 11.782,59.9 14.987,59.9 10.034,61.424 13.209,61.424 16.384,61.424 19.559,61.424 22.734,61.424 11.782,63.075 14.987,63.075 10.034,64.599 13.209,64.599 16.384,64.599 18.289,64.599 11.782,66.25 14.987,66.25 10.034,67.774 13.209,67.774 16.384,67.774 11.782,69.425 14.987,69.425 10.034,70.949 13.209,70.949 16.384,70.949 11.782,72.6 14.987,72.6 10.034,74.124 13.209,74.124 16.384,74.124 11.782,75.775 14.987,75.775 10.034,77.299 13.209,77.299 16.384,77.299 11.782,78.95 14.987,78.95 10.034,80.474 13.209,80.474 16.384,80.474 19.559,80.474
pads on no net: CN1.16 CN1.18 CN1.20 RN2.5 U11.1 U11.3 U11.7 U11.8 U15.3 U15.4 U15.5 U15.6 U15.19 U15.25

## Polygon pours and split planes (outlines as drawn)
GNDA on Bottom Layer "GNDA_L04_P055" (solid, pour order 55): 15.368,-0.552 15.368,13.545 17.781,15.958 46.737,15.958 47.626,15.069 47.626,-0.425
GNDA on Bottom Layer "GNDA_L04_P057" (solid, pour order 57): 15.368,-0.552 15.368,13.545 17.781,15.958 46.737,15.958 47.626,15.069 47.626,-0.425
NetQ2_2 on Bottom Layer "NETQ2_2_L04_P031" (solid, pour order 31): 21.718,79.585 19.686,77.553 19.686,69.298 20.702,68.282 32.894,68.282 32.894,74.378 31.243,76.029 26.163,76.029 26.163,78.823 25.147,79.585
GND on Bottom Layer "GND_L04_P009" (solid, pour order 9): 64.644,73.87 64.644,71.203 63.628,70.187 56.008,70.187 55.246,69.425 55.246,43.39 54.357,42.501 46.991,42.501 46.737,42.755 46.737,46.057 48.896,46.057 51.563,48.724 51.563,72.981 52.452,73.87
NetQ5_1 on Bottom Layer "NETQ5_1_L04_P028" (solid, pour order 28): 19.94,48.851 19.94,45.041 20.575,44.406 38.355,44.406 39.498,43.263 42.927,43.263 42.927,46.311 43.689,47.073 46.61,47.073 46.864,47.327 46.864,48.724 26.544,48.724 25.147,47.327 23.496,47.327 23.115,47.708 23.115,48.851
NetF2_2 on Bottom Layer "NETF2_2_L04_P027" (solid, pour order 27): 79.884,85.173 77.852,83.141 26.417,83.141 26.417,98.254 26.798,98.635 78.233,98.635 79.884,96.984
OUTC- on Bottom Layer "OUTC-_L04_P023" (solid, pour order 23): 82.17,93.428 88.139,93.428 89.282,94.571 97.664,94.571 98.299,93.936 98.299,87.078 97.537,86.316 85.472,86.316 82.17,89.618
SENSE- on Bottom Layer "SENSE-_L04_P017" (solid, pour order 17): 98.299,68.917 83.186,68.917 78.106,73.997 65.533,73.997 65.279,73.743 65.279,70.695 63.882,69.298 56.643,69.298 56.643,63.202 56.77,63.075 82.551,63.075 84.329,61.297 98.299,61.297
SENSE+ on Bottom Layer "SENSE+_L04_P008" (solid, pour order 8): 43.816,57.868 42.118,59.566 42.118,80.225 43.256,81.363 83.821,81.363 87.758,77.426 97.664,77.426 98.553,76.537 98.553,69.679 98.299,69.425 83.694,69.425 78.487,74.632 51.182,74.632 51.182,58.249 50.801,57.868
NetQ10_3 on Bottom Layer "NETQ10_3_L04_P015" (solid, pour order 15): 66.549,53.042 66.549,60.281 67.184,60.916 70.232,60.916 70.232,53.296 69.978,53.042
NetQ11_3 on Bottom Layer "NETQ11_3_L04_P013" (solid, pour order 13): 61.469,56.344 56.516,56.344 55.754,55.582 55.754,48.597 59.564,48.597 59.564,52.153 59.691,52.28 62.866,52.28 62.866,56.344
GND on Bottom Layer "GND_L04_P004" (solid, pour order 4): 21.836,90.126 11.177,90.126 11.177,83.776 6.351,78.95 6.351,51.899 0.382,51.899 0.382,98.254 0.89,98.762 21.719,98.762
VIN on Bottom Layer "VIN_L04_P001" (solid, pour order 1): 11.685,89.491 11.685,83.395 6.986,78.696 6.986,58.122 7.621,57.487 24.512,57.487 24.512,61.17 19.305,66.377 19.305,78.188 21.845,80.728 21.845,89.491 11.812,89.491
GND on Top Layer 1 "GND_L01_P045" (solid, pour order 45): 21.836,90.126 11.177,90.126 11.177,83.776 6.351,78.95 6.351,51.899 0.382,51.899 0.382,98.254 0.89,98.762 21.719,98.762
GNDA on Top Layer 1 "GNDA_L01_P053" (solid, pour order 53): 15.368,-0.552 15.368,13.545 17.781,15.958 45.213,15.958 47.626,13.545 47.626,-0.425
NetQ11_3 on Top Layer 1 "NETQ11_3_L01_P014" (solid, pour order 14): 61.469,56.344 56.516,56.344 55.754,55.582 55.754,48.597 59.564,48.597 59.564,52.153 59.691,52.28 62.866,52.28 62.866,56.344
GND on Top Layer 1 "GND_L01_P030" (solid, pour order 30): 64.644,73.87 64.644,71.203 63.628,70.187 56.008,70.187 55.246,69.425 55.246,42.755 54.992,42.501 46.991,42.501 46.737,42.755 46.737,46.057 48.896,46.057 51.563,48.724 51.563,72.981 52.452,73.87
NetQ5_1 on Top Layer 1 "NETQ5_1_L01_P048" (solid, pour order 48): 19.94,48.851 19.94,45.041 20.575,44.406 38.355,44.406 40.133,42.628 42.927,42.628 42.927,46.311 43.689,47.073 46.61,47.073 46.864,47.327 46.864,48.724 26.544,48.724 25.147,47.327 23.496,47.327 23.115,47.708 23.115,48.851
SENSE- on Top Layer 1 "SENSE-_L01_P047" (solid, pour order 47): 98.299,68.917 83.186,68.917 78.106,73.997 65.533,73.997 64.136,72.6 64.136,69.552 63.882,69.298 56.643,69.298 56.643,63.202 56.77,63.075 82.551,63.075 84.329,61.297 98.299,61.297
NetQ11_3 on Top Layer 1 "NETQ11_3_L01_P046" (solid, pour order 46): 61.469,56.344 56.516,56.344 55.754,55.582 55.754,48.597 59.564,48.597 59.564,52.153 59.691,52.28 62.866,52.28 62.866,56.344
VIN on Top Layer 1 "VIN_L01_P044" (solid, pour order 44): 11.685,89.491 11.685,83.395 6.986,78.696 6.986,57.487 24.512,57.487 24.512,61.17 19.305,66.377 19.305,78.188 21.845,80.728 21.845,89.491 11.812,89.491
+3.3V on Top Layer 1 "+3.3V_L01_P039" (solid, pour order 39): 8.764,20.276 8.764,16.339 6.351,13.926 6.351,7.703 7.367,6.687 13.844,6.687 15.114,7.957 15.114,20.022 14.733,20.403
GND on Top Layer 1 "GND_L01_P038" (solid, pour order 38): 2.414,35.77 7.24,35.77 7.748,35.262 7.748,24.848 7.113,24.213 2.795,24.213 2.16,24.848 2.16,35.897
+5V on Top Layer 1 "+5V_L01_P037" (solid, pour order 37): 11.431,40.469 11.431,36.913 8.51,33.992 8.51,22.816 8.637,22.689 10.669,22.689 11.558,23.578 11.558,25.991 13.971,28.404 13.971,40.215 13.717,40.469
NetC29_1 on Top Layer 1 "NETC29_1_L01_P036" (solid, pour order 36): 2.287,41.612 4.065,43.39 4.954,44.279 4.954,44.914 5.589,44.914 5.716,44.787 5.716,42.12 6.732,41.104 7.367,41.104 7.875,40.596 7.875,36.913 2.541,36.913 2.287,37.167
+3.3V on Top Layer 1 "+3.3V_L01_P035" (solid, pour order 35): 71.756,13.418 71.756,12.148 71.883,12.021 71.883,6.687 73.153,6.687 73.153,11.259 72.01,12.402 72.01,13.418
GND on Top Layer 1 "GND_L01_P034" (solid, pour order 34): 19.432,63.75 19.432,98.635 56.643,98.635 57.532,97.746 57.532,81.744 57.151,81.363 43.256,81.363 42.038,80.145 42.038,63.456
GND on Top Layer 1 "GND_L01_P033" (solid, pour order 33): 49.277,42.501 55.754,42.501 55.881,42.374 59.437,42.374 59.437,44.787 48.007,44.787 47.372,44.152
NetF1_2 on Top Layer 1 "NETF1_2_L01_P025" (solid, pour order 25): 79.63,86.443 78.233,86.443 74.677,89.999 74.677,96.349 73.153,97.873 61.088,97.873 60.072,96.857 60.072,83.522 61.215,82.379 79.376,82.379 79.63,82.633
NetF1_2 on Top Layer 1 "NETF1_2_L01_P026" (solid, pour order 26): 79.63,86.443 75.566,86.443 74.677,87.332 74.677,96.349 73.153,97.873 61.088,97.873 60.072,96.857 60.072,83.522 61.215,82.379 79.376,82.379 79.63,82.633
OUTC+ on Top Layer 1 "OUTC+_L01_P022" (solid, pour order 22): 98.045,77.807 87.885,77.807 83.059,82.633 82.17,82.633 82.17,86.316 82.297,86.443 88.012,86.443 98.045,86.289
SENSE+ on Top Layer 1 "SENSE+_L01_P018" (solid, pour order 18): 43.816,57.868 42.118,59.566 42.118,80.225 43.256,81.363 83.821,81.363 87.758,77.426 97.664,77.426 98.553,76.537 98.553,69.679 98.299,69.425 83.694,69.425 78.487,74.632 51.182,74.632 51.182,58.249 50.801,57.868
NetQ10_3 on Top Layer 1 "NETQ10_3_L01_P016" (solid, pour order 16): 66.549,53.042 66.549,60.281 67.184,60.916 70.232,60.916 70.232,53.296 69.978,53.042
NetQ11_3 on Top Layer 1 "NETQ11_3_L01_P012" (solid, pour order 12): 60.326,60.789 60.326,53.042 62.866,53.042 62.866,60.789
SW2 on Top Layer 1 "SW2_L01_P007" (solid, pour order 7): 36.704,48.978 42.927,48.978 43.562,49.613 48.261,49.613 48.261,54.312 48.134,54.439 46.991,54.439 46.991,56.344 46.864,56.471 43.689,56.471 43.562,56.344 43.562,53.804 37.339,53.804 36.704,53.169
SW1 on Top Layer 1 "SW1_L01_P006" (solid, pour order 6): 19.559,56.725 19.559,50.502 20.321,49.74 25.528,49.74 26.29,48.978 30.1,48.978 30.481,49.359 30.481,54.058 30.1,54.439 23.115,54.439 23.115,56.471 22.861,56.725
GND on GND "GND_L02_P060" (solid, pour order 60): 0.382,98.254 0.382,51.899 16.892,51.899 19.94,48.851 19.94,45.041 20.575,44.406 38.355,44.406 40.133,42.628 55.119,42.628 65.533,53.042 69.597,53.042 74.296,57.741 98.299,57.741 98.299,98.635 97.791,99.143 1.271,99.143 0.89,98.762
GNDA on GND "GNDA_L02_P059" (solid, pour order 59): 15.368,-0.552 15.368,13.545 17.781,15.958 46.737,15.958 47.626,15.069 47.626,-0.425
GND on GND "GND_L02_P058" (solid, pour order 58): 0.382,51.391 0.382,-0.552 15.368,-0.552 15.368,13.545 17.781,15.958 46.737,15.958 47.626,15.069 47.626,-0.425 98.934,-0.425 99.442,0.083 99.442,56.852 74.55,56.852 69.978,52.28 65.66,52.28 55.373,41.993 40.006,41.993 38.228,43.771 20.575,43.771 19.432,44.914 19.432,48.343 16.384,51.391
GNDA on GND "GNDA_L02_P054" (solid, pour order 54): 15.368,-0.552 15.368,13.545 17.781,15.958 46.737,15.958 47.626,15.069 47.626,-0.425
GND on GND "GND_L02_P005" (solid, pour order 5): 21.836,90.126 11.177,90.126 11.177,83.776 6.351,78.95 6.351,51.899 0.382,51.899 0.382,98.254 0.89,98.762 21.719,98.762
GND on POWER "GND_L03_P050" (solid, pour order 50): 0.382,98.254 0.382,51.899 16.892,51.899 19.94,48.851 19.94,45.041 20.575,44.406 38.355,44.406 40.133,42.628 55.119,42.628 65.533,53.042 69.597,53.042 74.296,57.741 98.299,57.741 98.299,98.635 97.791,99.143 1.271,99.143 0.89,98.762
+3.3V on POWER "+3.3V_L03_P051" (solid, remove dead copper, pour order 51): 0.382,51.391 0.382,-0.552 15.368,-0.552 15.368,13.545 17.781,15.958 44.959,15.958 47.626,13.291 47.626,-0.425 98.934,-0.425 99.442,0.083 99.442,41.993 55.373,41.993 40.006,41.993 38.228,43.771 20.575,43.771 19.432,44.914 19.432,48.343 16.384,51.391
+3.3V_A on POWER "+3.3V_A_L03_P052" (solid, pour order 52): 15.368,-0.552 15.368,13.545 17.781,15.958 44.959,15.958 47.626,13.291 47.626,-0.425

## Other copper
Top Layer 1:
  pour cut-out: 48.261,44.152 46.483,44.152 46.483,40.215 45.467,40.215 45.467,44.279 45.975,44.787 48.261,44.787

## Silkscreen, mask and mechanical layers (free items; w line width, h text height)
Mechanical 1:
  lines w0.254: 0,0 0,99 ; 0.001,99.067 99.001,99.067 ; 0.06,-0.051 99.06,-0.051 ; 99.061,0.016 99.061,99.016